# Altium PCB PCB1.PcbDoc
Units mm, origin at the board's own origin, x right, y up, seen from the top; angles counter-clockwise.
Board outline 100 x 100 mm, 2 copper layers (Top Layer, Bottom Layer); 31 components, 67 nets, 286 pads, 40 vias.
Unrouted connection lines stored in the file: 58.
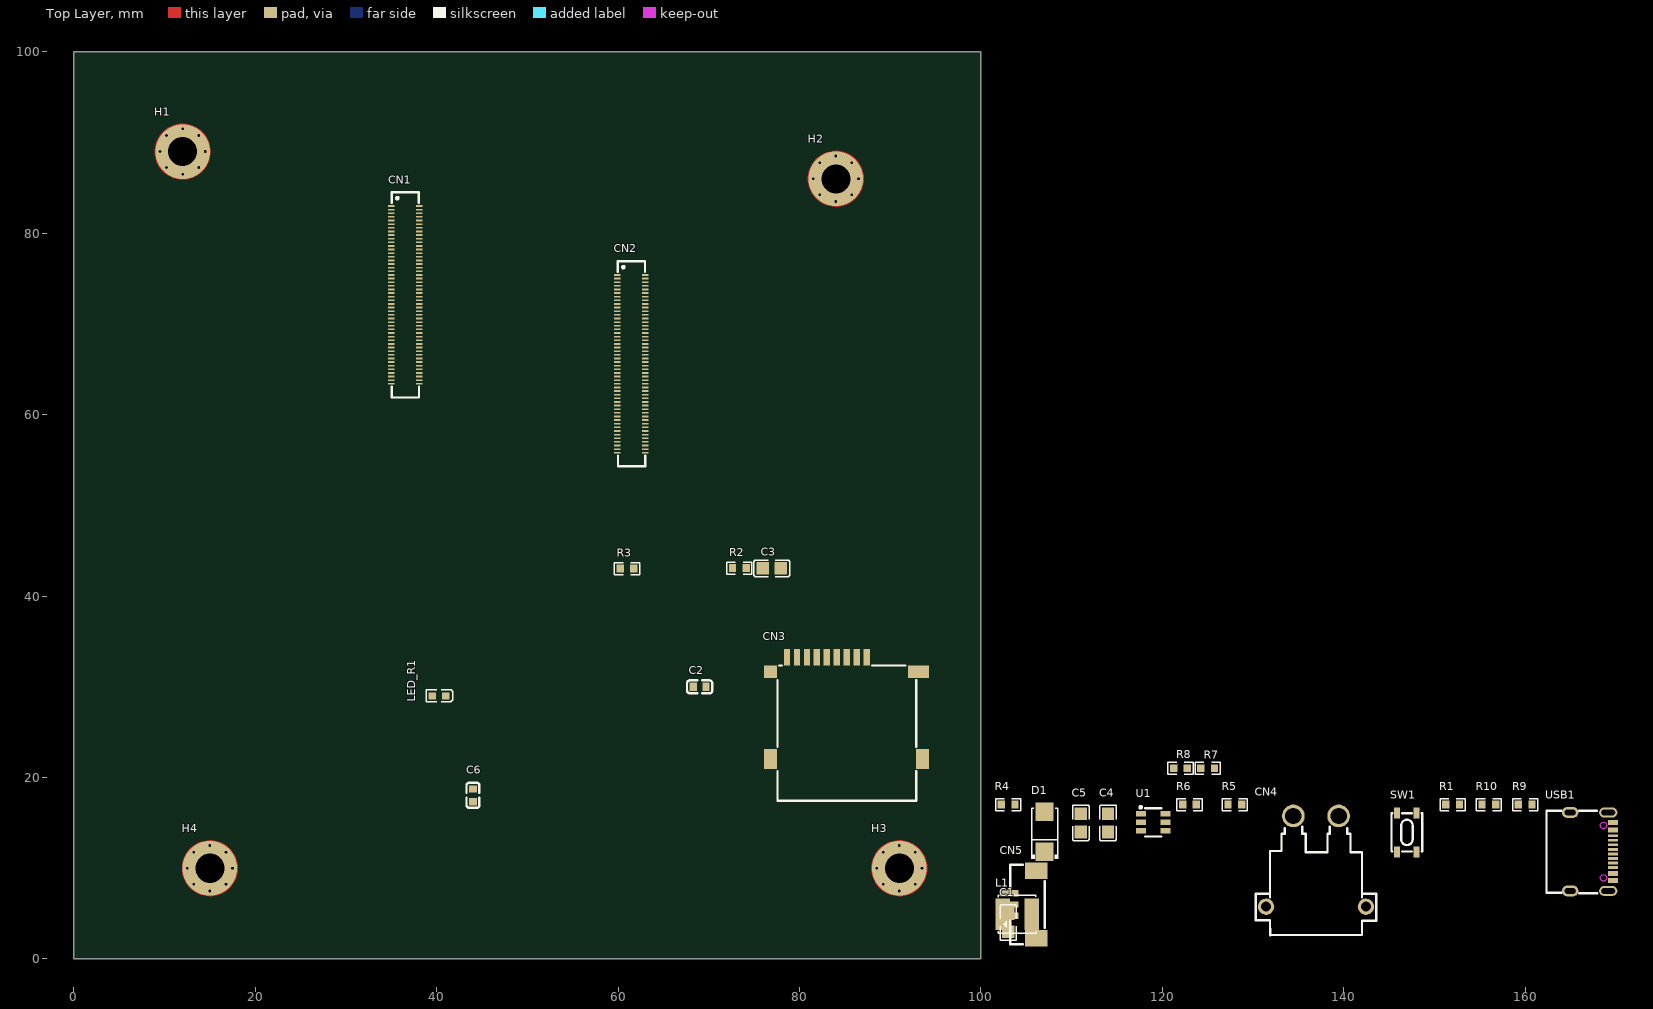
[diagram p0: Top Layer view]
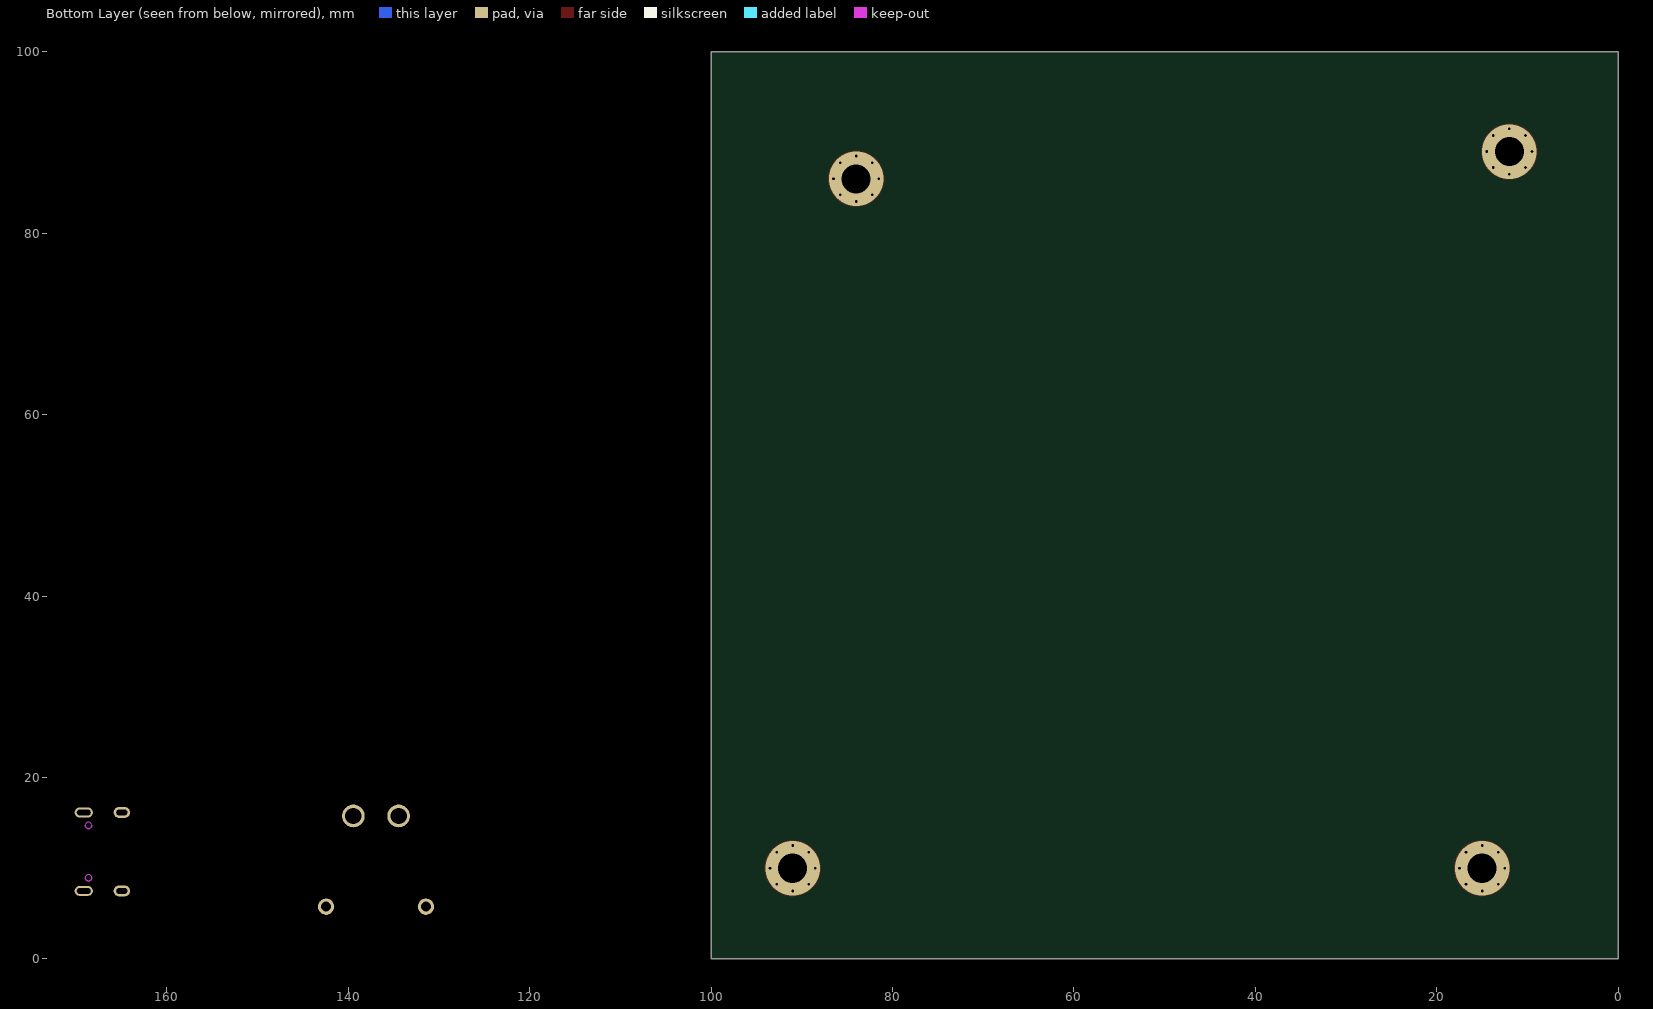
[diagram p1: Bottom Layer view, seen from below]

## Layer stack, top to bottom
Top Solder: solder mask 0.0102, Solder Resist, Dk 3.5
Top Layer: signal copper 0.0356
Dielectric 1: dielectric 0.32, FR-4, Dk 4.8
Bottom Layer: signal copper 0.0356
Bottom Solder: solder mask 0.0102, Solder Resist, Dk 3.5

## Board outline
0,0 0,100 100,100 100,0

## Design rules (kind name [scope] priority, off if disabled: settings)
Clearance [All] p1: gap=0.254 ignorepadtopadclearanceinfootprint=FALSE
PolygonConnect [All] p1: connectstyle=Relief reliefconductorwidth=0.254 reliefentries=4 polygonreliefangle="90 Angle" airgapwidth=0.254
RoutingVias [All] p1: holewidth=0.711 width=1.27 viastyle="Through Hole" minholewidth=0.711 minwidth=1.27 maxholewidth=0.711 maxwidth=1.27
SolderMaskExpansion [All] p1: expansion=0.102 istentingtop=FALSE
SupplyNets "Schematic Supply Nets_4" [InNet('VBUS')] p1: voltage=0.000
SupplyNets "Schematic Supply Nets_3" [InNet('VCC')] p2: voltage=0.000
SupplyNets "Schematic Supply Nets_2" [InNet('3V3')] p3: voltage=0.000
SupplyNets "Schematic Supply Nets_1" [InNet('GND')] p4: voltage=0.000
SupplyNets "Schematic Supply Nets" [InNet('VCC5V0_SYS')] p5: voltage=0.000
Width [All] p1: maxlimit=0.254 minlimit=0.254 preferedwidth=0.254
30 further rules are at their usual default settings.

## Components (designator, comment, footprint, x,y, rotation, side; value= is the part's Value field where it differs from the comment)
C1 "10uF" C0805 103,4 r90 top
C2 "100nF" C0603 69,30 r0 top
C3 "22uF" C0805 76.929,43.067 r0 top
C4 "22uF" C0805 114,15 r90 top
C5 "10uF" C0805 111,15 r90 top
C6 "100nF" C0603 44,18.05 r90 top
CN1 "DF40HC(3.0)-100DS-0.4V(58)" DF40HC_3.0_100DS_0.4V_58 36.555,73.197 r0 top
CN2 "DF40HC(3.0)-100DS-0.4V(58)" DF40HC_3.0_100DS_0.4V_58 61.475,65.597 r0 top
CN3 "MicroSD_Socket_PushPush" "TF卡槽 (自弹式)" 85,25 r0 top
CN4 "XT30PW-M30.G.Y" XT30PW-M30.G.Y 137,8 r0 top
CN5 "ZX-MX1.25-3PLT" MX1.25-3PLT 105,6 r90 top
D1 "SMAJ36A" SMA_DO-214AC 107,14 r90 top
H1 "MountingHole_M3_GND" MountingHole_M3_GND_3.2 12,89 r0 top
H2 "MountingHole_M3_GND" MountingHole_M3_GND_3.2 84,86 r0 top
H3 "MountingHole_M3_GND" MountingHole_M3_GND_3.2 91,10 r0 top
H4 "MountingHole_M3_GND" MountingHole_M3_GND_3.2 15,10 r0 top
L1 "10uH" L4020 104,5 r0 top
LED_R1 "LED_R" LED_0603_R 40.251,29 r180 top
R1 "100Ω" R0603 152,17 r0 top
R2 "100kΩ" R0603 73.373,43.067 r0 top value=100Ω
R3 "13.3kΩ" R0603 61,43 r0 top value=100Ω
R4 "100Ω" R0603 103,17 r0 top
R5 "100Ω" R0603 128,17 r0 top
R6 "100Ω" R0603 123,17 r0 top
R7 "5.1kΩ" R0603 125,21 r0 top value=100Ω
R8 "220Ω" R0603 122,21 r0 top value=100Ω
R9 "220Ω" R0603 160,17 r0 top value=100Ω
R10 "5.1kΩ" R0603 156,17 r0 top value=100Ω
SW1 "HX TS3425PA 250gf 098" SW_SMD_4P_4.2X3.4 147,14 r90 top
U1 "TPS54308DDCR" SOT-23-6 119,15 r0 top
USB1 "USB_Type-C_16P_F" USB_Type-C_SMD_16P_F 166,12 r90 top

## Footprints (in the part's own frame and the unit in brackets; to place one, negate y for a bottom-side part, rotate by r counter-clockwise, add the part's x,y. Pads: shape width x height; smd on the part's side, far side on the other; paste and mask are expansions set on the pad)
C0603 [mil]
  rect 31.5x35.4 smd: 1(-27.8,0) 2(27.3,0)
  silkscreen extent -55,-28 54,28, body extent -32,-15 31,17, height 31
C0805 [mil]
  rect 55.5x53.1 smd paste-3937 mask+2: 1(-39.1,-0.4) 2(39.7,-0.4)
  silkscreen extent -77,-36 78,35, body extent -41,-26 37,25, height 51
DF40HC_3.0_100DS_0.4V_58 [mm] "Hirose DF40HC(3.0)-100DS-0.4V(58) 板对板连接器母座封装，100Pin，0.4mm 间距，3.0mm 配合高度"
  rect 0.7x0.19 smd paste+0 mask+0.051: 1(-1.555,9.803) 2(-1.555,9.403) 3(-1.555,9.003) 4(-1.555,8.603) 5(-1.555,8.203) 6(-1.555,7.803) 7(-1.555,7.403) 8(-1.555,7.003) 9(-1.555,6.603) 10(-1.555,6.203) 11(-1.555,5.803) 12(-1.555,5.403) 13(-1.555,5.003) 14(-1.555,4.603) 15(-1.555,4.203) 16(-1.555,3.803) 17(-1.555,3.403) 18(-1.555,3.003) 19(-1.555,2.603) 20(-1.555,2.203) 21(-1.555,1.803) 22(-1.555,1.403) 23(-1.555,1.003) 24(-1.555,0.603) 25(-1.555,0.203) 26(-1.555,-0.197) 27(-1.555,-0.597) 28(-1.555,-0.997) 29(-1.555,-1.397) 30(-1.555,-1.797) 31(-1.555,-2.197) 32(-1.555,-2.597) 33(-1.555,-2.997) 34(-1.555,-3.397) 35(-1.555,-3.797) 36(-1.555,-4.197) 37(-1.555,-4.597) 38(-1.555,-4.997) 39(-1.555,-5.397) 40(-1.555,-5.797) 41(-1.555,-6.197) 42(-1.555,-6.597) 43(-1.555,-6.997) 44(-1.555,-7.397) 45(-1.555,-7.797) 46(-1.555,-8.197) 47(-1.555,-8.597) 48(-1.555,-8.997) 49(-1.555,-9.397) 50(-1.555,-9.797) 51(1.525,-9.797) 52(1.525,-9.397) 53(1.525,-8.997) 54(1.525,-8.597) 55(1.525,-8.197) 56(1.525,-7.797) 57(1.525,-7.397) 58(1.525,-6.997) 59(1.525,-6.597) 60(1.525,-6.197) 61(1.525,-5.797) 62(1.525,-5.397) 63(1.525,-4.997) 64(1.525,-4.597) 65(1.525,-4.197) 66(1.525,-3.797) 67(1.525,-3.397) 68(1.525,-2.997) 69(1.525,-2.597) 70(1.525,-2.197) 71(1.525,-1.797) 72(1.525,-1.397) 73(1.525,-0.997) 74(1.525,-0.597) 75(1.525,-0.197) 76(1.525,0.203) 77(1.525,0.603) 78(1.525,1.003) 79(1.525,1.403) 80(1.525,1.803) 81(1.525,2.203) 82(1.525,2.603) 83(1.525,3.003) 84(1.525,3.403) 85(1.525,3.803) 86(1.525,4.203) 87(1.525,4.603) 88(1.525,5.003) 89(1.525,5.403) 90(1.525,5.803) 91(1.525,6.203) 92(1.525,6.603) 93(1.525,7.003) 94(1.525,7.403) 95(1.525,7.803) 96(1.525,8.203) 97(1.525,8.603) 98(1.525,9.003) 99(1.525,9.403) 100(1.525,9.803)
  silkscreen extent -1.52,-11.3 1.51,11.3, body extent -1.72,-11.29 1.66,11.31, height 2.83
L4020 [mil] "SMD 贴片功率电感;标称尺寸4.0 × 4.0 mm;额定电流 1.1A;饱和电流 1.5A"
  rect 63x137.8 smd: 1(-63.5,-2.5) 2(62.5,-2.5)
  silkscreen extent -82,-85 82,80, body extent -78,-81 79,76, height 75
LED_0603_R [mil]
  rect 31.5x31.5 smd: 1(-29.5,0) 2(29.5,0)
  silkscreen extent -61,-26 55,26, body extent -31,-16 31,16, height 24
MountingHole_M3_GND_3.2 [mm]
  Top Layer circle w0.2: c0,0 r3
MX1.25-3PLT [mm] "MX1.25-3PLT，3Pin，1.25mm间距，SMD连接器"
  rect 0.7x2 smd paste+0 mask+0.05: 1(-1.243,1.863) 2(0.007,1.863) 3(1.257,1.863)
  rect 1.8x2.5 smd paste+0 mask+0.05: 4(3.737,-1.087) 5(-3.723,-1.087)
  silkscreen extent -4.37,-2.04 4.38,2.55
R0603 [mil]
  rect 31.8x34 smd paste-3937 mask+2: 1(-30.1,1) 2(29.2,1)
  silkscreen extent -55,-25 54,27, body extent -32,-14 31,17, height 18
SMA_DO-214AC [mm] "SMA（DO-214AC）贴片二极管封装，2焊盘，适用于TVS及整流二极管"
  rect 1.999x1.999 smd: 1(-2.174,-0.02) 2(2.225,-0.02)
  silkscreen extent -2.96,-1.52 2.63,1.48, body extent -2.35,-1.33 2.35,1.27, height 2.07
SOT-23-6 [mm] "SOT-23-6贴片封装，本体约2.9×1.6mm，0.95mm引脚间距"
  rect 1.1x0.6 smd paste+0 mask+0.051: 1(-1.347,1.011) 2(-1.347,0.061) 3(-1.347,-0.889) 4(1.353,-0.889) 5(1.353,0.061) 6(1.353,1.011)
  silkscreen extent -1.52,-1.49 0.9,1.84, body extent -1.25,-1.42 1.25,1.58, height 1.1
SW_SMD_4P_4.2X3.4 [mm] "4脚贴片轻触按键，卧式顶部按压，尺寸4.2×3.4mm，高度2.5mm"
  rect 1.199x0.65 smd: 1(-2.195,1.125) 2(2.106,1.125) 3(-2.195,-1.026) 4(2.106,-1.026)
  silkscreen extent -2.14,-1.65 2.05,1.75, body extent -2.65,-1.67 2.55,1.73, height 2.47
"TF卡槽 (自弹式)" [mil] "MicroSD（TF）卡槽，贴片，Push-Push 自弹式"
  rect 27.6x70.9 smd: 1(95.1,325) 2(51.8,325) 3(8.5,325) 4(-34.8,325) 5(-78.1,325) 6(-121.4,325) 7(-164.7,325) 8(-208,325) CD(-251.3,325)
  rect 90.6x55.1 smd: 10(319.5,262.1)
  rect 57.1x55.1 smd: 11(-323,262.1)
  rect 57.1x86.6 smd: 12(336.5,-115.9) 13(-323,-115.9)
  silkscreen extent -292,-297 310,290, body extent -314,-360 320,311, height 73
USB_Type-C_SMD_16P_F [mil] "USB_Type-C贴片母座16P"
  rect 21.7x43.3 smd paste-3937 mask+2: 1(119.2,-145.4) 2(87.7,-145.4) 11(-101.3,-145.4) 12(-132.8,-145.4)
  rect 11.8x43.3 smd paste-3937 mask+2: 3(62.1,-145.4) 4(42.4,-145.4) 5(22.7,-145.4) 6(3,-145.4) 7(-16.6,-145.4) 8(-36.3,-145.4) 9(-56,-145.4) 10(-75.7,-145.4)
  oval 43.3x78.7 hole 23.6 slot 59.1 at 90 deg paste-99999 mask+2: 13(163.5,-123.7) 14(-177.1,-123.7)
  oval 47.2x70.9 hole 23.6 slot 47.2 at 90 deg paste-99999 mask+2: 13(163.5,41.6) 14(-177.1,41.6)
  Keep-Out Layer board cut-out: -134.4,-103.3 -134,-100.1 -132.9,-97.1 -131.1,-94.4 -128.8,-92.2 -126,-90.6 -123,-89.7 -119.8,-89.5 -116.6,-90.1 -113.7,-91.3 -111.1,-93.2 -109.1,-95.7 -107.6,-98.5 -106.9,-101.7 -106.9,-104.9 -107.6,-108 -109.1,-110.8 -111.1,-113.3 -113.7,-115.2 -116.6,-116.5 -119.8,-117 -123,-116.8 -126,-115.9 -128.8,-114.3 -131.1,-112.1 -132.9,-109.4 -134,-106.4 -134.4,-103.3
  Keep-Out Layer board cut-out: 93.2,-103.3 93.6,-100.1 94.7,-97.1 96.4,-94.4 98.7,-92.2 101.5,-90.6 104.6,-89.7 107.8,-89.5 110.9,-90.1 113.9,-91.3 116.4,-93.2 118.5,-95.7 119.9,-98.5 120.7,-101.7 120.7,-104.9 119.9,-108 118.5,-110.8 116.4,-113.3 113.9,-115.2 110.9,-116.5 107.8,-117 104.6,-116.8 101.5,-115.9 98.7,-114.3 96.4,-112.1 94.7,-109.4 93.6,-106.4 93.2,-103.3
  Keep-Out Layer region: -134.4,-103.3 -134,-100.1 -132.9,-97.1 -131.1,-94.4 -128.8,-92.2 -126,-90.6 -123,-89.7 -119.8,-89.5 -116.6,-90.1 -113.7,-91.3 -111.1,-93.2 -109.1,-95.7 -107.6,-98.5 -106.9,-101.7 -106.9,-104.9 -107.6,-108 -109.1,-110.8 -111.1,-113.3 -113.7,-115.2 -116.6,-116.5 -119.8,-117 -123,-116.8 -126,-115.9 -128.8,-114.3 -131.1,-112.1 -132.9,-109.4 -134,-106.4 -134.4,-103.3
  Keep-Out Layer region: -134.4,-103.3 -134,-100.1 -132.9,-97.1 -131.1,-94.4 -128.8,-92.2 -126,-90.6 -123,-89.7 -119.8,-89.5 -116.6,-90.1 -113.7,-91.3 -111.1,-93.2 -109.1,-95.7 -107.6,-98.5 -106.9,-101.7 -106.9,-104.9 -107.6,-108 -109.1,-110.8 -111.1,-113.3 -113.7,-115.2 -116.6,-116.5 -119.8,-117 -123,-116.8 -126,-115.9 -128.8,-114.3 -131.1,-112.1 -132.9,-109.4 -134,-106.4 -134.4,-103.3
  Keep-Out Layer region: 93.2,-103.3 93.6,-100.1 94.7,-97.1 96.4,-94.4 98.7,-92.2 101.5,-90.6 104.6,-89.7 107.8,-89.5 110.9,-90.1 113.9,-91.3 116.4,-93.2 118.5,-95.7 119.9,-98.5 120.7,-101.7 120.7,-104.9 119.9,-108 118.5,-110.8 116.4,-113.3 113.9,-115.2 110.9,-116.5 107.8,-117 104.6,-116.8 101.5,-115.9 98.7,-114.3 96.4,-112.1 94.7,-109.4 93.6,-106.4 93.2,-103.3
  Keep-Out Layer region: 93.2,-103.3 93.6,-100.1 94.7,-97.1 96.4,-94.4 98.7,-92.2 101.5,-90.6 104.6,-89.7 107.8,-89.5 110.9,-90.1 113.9,-91.3 116.4,-93.2 118.5,-95.7 119.9,-98.5 120.7,-101.7 120.7,-104.9 119.9,-108 118.5,-110.8 116.4,-113.3 113.9,-115.2 110.9,-116.5 107.8,-117 104.6,-116.8 101.5,-115.9 98.7,-114.3 96.4,-112.1 94.7,-109.4 93.6,-106.4 93.2,-103.3
  Keep-Out Layer lines w0.1: -119.8,-89.5 -116.6,-90.1 -113.7,-91.3 -111.1,-93.2 -109.1,-95.7 -107.6,-98.5 -106.9,-101.7 -106.9,-104.9 -107.6,-108 -109.1,-110.8 -111.1,-113.3 -113.7,-115.2 -116.6,-116.5 -119.8,-117 -123,-116.8 -126,-115.9 -128.8,-114.3 -131.1,-112.1 -132.9,-109.4 -134,-106.4 -134.4,-103.3 -134,-100.1 -132.9,-97.1 -131.1,-94.4 -128.8,-92.2 -126,-90.6 -123,-89.7 -119.8,-89.5 ; 107.8,-89.5 110.9,-90.1 113.9,-91.3 116.4,-93.2 118.5,-95.7 119.9,-98.5 120.7,-101.7 120.7,-104.9 119.9,-108 118.5,-110.8 116.4,-113.3 113.9,-115.2 110.9,-116.5 107.8,-117 104.6,-116.8 101.5,-115.9 98.7,-114.3 96.4,-112.1 94.7,-109.4 93.6,-106.4 93.2,-103.3 93.6,-100.1 94.7,-97.1 96.4,-94.4 98.7,-92.2 101.5,-90.6 104.6,-89.7 107.8,-89.5
  silkscreen extent -187,-75 170,144, body extent -196,-161 182,142, height 125
XT30PW-M30.G.Y [mil] "AMASS XT30系列，2Pin，卧式PCB通孔安装，公头"
  round 98.4 hole 70.9: 1(-101.3,305.7) 2(95.6,305.7)
  round 70.9 hole 43.3: 3(213.7,-88) 4(-219.4,-88)
  silkscreen extent -265,-212 259,259, body extent -266,-205 258,344, height 197

## Part data
C1 C2 C3 C4 C5 C6: library part C, "贴片电容(MLCC)", Voltage=50V
CN1 CN2: library part DF40HC_3.0_100DS_0.4V, "Hirose DF40系列，100Pin，0.4mm间距，3.0mm配合高度，板对板连接器母座"
CN3: "卡连接方式:自弹式;卡类型:MicroSD卡(TF卡);连接器类型:卡座;本体最大高度:1.8mm;工作温度:-40℃~+85℃;"
CN4: "XT30系列，2Pin，PCB卧式插头，额定电流15A", contact resistance=1.2mΩ, JLCPCB Part Class="Extended Part", LCSC Part Name="AMASS(艾迈斯)航模插头电调机插座锂电池连接器 PCB板卧式 公头XT30PW-M30.G.Y", Manufacturer=AMASS(艾迈斯), Rated current=15A, Rated voltage=500VDC, AddInBom=yes, Connector type=航模插头, ConvertToPcb=yes, Datasheet=https://item.szlcsc.com/datasheet/XT30PW-M30.G.Y/426930.html, Device=XT30PW-M30.G.Y, FootprintName=CONN-TH_XT30PW-M, interface form=公头, ManufacturerPart=XT30PW-M30.G.Y, ModelId=722652c2597f41cd937322584dc4b29b聨0819f05c4eef4c71ace90d822a990e87, ModelName=CONN-TH_XT30PW-M, ModelTransform=523.621,549.2115,0,0,0,0,-0.005,-39.568,-78.74, Size/Specification=2pin, Supplier=LCSC, Supplier Footprint=-, SupplierPart=C431092, Symbol=XT30PW-M, Wire gauge=16/18/20AWG
CN5: "插针结构:1x3P;间距:1.25mm;安装方式:立贴;参考系列:PicoBlade(MX 1.25);总PIN数:3P;排数:1;每排PIN数:3;行距:-;额定电流:1A;触头材质:黄铜;触头镀层:锡;工作温度:-25℃~+85℃;"
D1: "36V 单向瞬态抑制二极管（TVS），SMA（DO-214AC）"
H1 H2 H3 H4: library part MountingHole_M3, "M3 金属化通孔安装孔，连接 GND，用于 PCB 螺丝固定及接地"
L1: library part L
R1 R2 R3: library part "FRC0603J101 TS", "电阻类型:厚膜电阻;阻值:100Ω;精度:±5%;功率:100mW;工作电压:75V;温度系数:±100ppm/℃;", JLCPCB Part Class="Extended Part", LCSC Part Name="100Ω ±5% 100mW 厚膜电阻", Manufacturer=FOJAN(富捷), Operating Temperature=-55℃~+155℃, Power(Watts)=100mW, Temperature Coefficient=±100ppm/℃, Tolerance=±5%, Voltage-Supply(Max)=75V, AddInBom=yes, ConvertToPcb=yes, Datasheet=https://item.szlcsc.com/datasheet/FRC0603J101%2520TS/3180602.html, Device="FRC0603J101 TS", FootprintName=R0603, ManufacturerPart="FRC0603J101 TS", ModelId=fc143cca1e79419f9cd78b61e9279f08聨0819f05c4eef4c71ace90d822a990e87, ModelName=R0603, ModelTransform=31.8897,63.7794,0,90,0,0,0,0,0, Supplier=LCSC, Supplier Footprint=0603, SupplierPart=C2907089, Symbol="FRC0603J101 TS", Type=厚膜电阻
R4: library part R, "贴片电阻"
R5 R6 R7 R8 R9 R10: library part FRC0603F1000TS, "电阻类型:厚膜电阻;阻值:100Ω;精度:±1%;功率:100mW;工作电压:75V;温度系数:±100ppm/℃;", JLCPCB Part Class="Extended Part", LCSC Part Name="100Ω ±1% 100mW 厚膜电阻", Manufacturer=FOJAN(富捷), Operating Temperature=-55℃~+155℃, Power(Watts)=100mW, Temperature Coefficient=±100ppm/℃, Tolerance=±1%, Voltage-Supply(Max)=75V, 3D Model=fc143cca1e79419f9cd78b61e9279f08聨0819f05c4eef4c71ace90d822a990e87, 3D Model Transform=31.8897,63.7794,0,90,0,0,0,0,0, AddInBom=yes, ConvertToPcb=yes, Datasheet=https://item.szlcsc.com/datasheet/FRC0603F1000TS/3180494.html, Device=FRC0603F1000TS, FootprintName=R0603, Manufacturer Part=FRC0603F1000TS, ModelName=R0603, Supplier=LCSC, Supplier Footprint=0603, Supplier Part=C2906981, Symbol=FRC0603F1000TS, Type=厚膜电阻
SW1: library part "HX TS3425PA", "4Pin贴片轻触开关，4.2×3.4mm，操作高度2.5mm，操作力250gf", Actuator/Cap Color=白色, Contact Current=50mA, JLCPCB Part Class="Extended Part", LCSC Part Name="电子烟轻触开关 平脚3.4*4.2*2.5mm 250gf", Manufacturer=hanxia(韩下), Operating Force=1.6N, Operating Temperature=-20℃~+80℃, Voltage Rating=12V, 3D Model=8f5161de2aba47ef91b81c2f817ddd4f聨0819f05c4eef4c71ace90d822a990e87, 3D Model Transform=204.724,133.858,0,0,0,0,0.002,0.002,0, Actuator Style=椭圆形按钮, AddInBom=yes, Circuit=单刀单掷, ConvertToPcb=yes, Datasheet=https://item.szlcsc.com/datasheet/HX%2520TS3425PA%2520250gf%2520098/8703857.html, Device="HX TS3425PA 250gf 098", FootprintName=SW-SMD_4P-L4.2-W3.4-P2.15-LS5.2, Length=4.2mm, Life=10万次, Manufacturer Part="HX TS3425PA 250gf 098", ModelName=SW-SMD_4P-L4.2-W3.4-H2.5-P2.15-LS5.2, Mounting Type=立贴, Supplier=LCSC, Supplier Footprint=SMD,4.2x3.4mm, Supplier Part=C7587757, Switch Height=2.5mm, Symbol="HX TS3425PA 250GF 098", Termination Style=SMD接片, Width=3.4mm, with Bracket=不带支架
U1: "3A 同步降压转换器，4.5V~28V 输入，可调输出，SOT-23-6"
USB1: "USB_Type-C母座", BOM名称=USB_Type-C母座

## Via types
v1: diameter 1, hole 0.3, Top Layer to Bottom Layer, 36 vias
v2: diameter 6, hole 3.2, Top Layer to Bottom Layer, 4 vias

## Nets (pads, with @x,y where several pads share a name; then routed paths per layer and width w, separated by ;. In a path a pad name is that pad's centre, name@x,y a point inside that pad or via, vN(x,y) a via of type N, cw(c..) or ccw(c..) an arc to the next point about the centre after c; other vN are vias at no path point)
3V3: C1.2 CN3.4
AUDIO_ADC0_MICN: CN2.66
AUDIO_ADC0_MICP: CN2.67
AUDIO_ADC1_MICN: CN2.64
AUDIO_ADC1_MICP: CN2.65
DN: R8.2
DP: R9.2
FSPI_CLK: CN2.93
FSPI_CSN: CN2.94
FSPI_D0: CN2.96
FSPI_D1: CN2.98
FSPI_D2: CN2.95
FSPI_D3: CN2.97
GND: C1.1 C3.1 C4.1 C5.1 C6.1 CN2.52 CN2.63 CN2.68 CN3.6 CN3.10 CN3.11 CN3.12 CN3.13 CN5.1 CN5.4 CN5.5 D1.2 LED_R1.2 R3.1 R7.2 R10.2 U1.1 USB1.1 USB1.12 USB1.13 USB1.14
GPIO0_A0_Z: CN2.81
GPIO0_A2_Z: CN2.79
GPIO0_A3_U: CN2.78
GPIO0_A5_U: CN2.75
GPIO0_A7_U: CN2.89
GPIO0_B0_D: CN2.90
GPIO0_B2_D: CN2.92
GPIO0_C5_D: CN2.83
GPIO0_C6_D: CN2.82
GPIO0_C7_D: CN2.84
GPIO0_D0_D: CN2.85
GPIO0_D1_D: CN2.86
GPIO_A4_D: CN2.87
GPIO_A5_U: R1.1
GPIO_A6_U: CN2.88
GPIO_B1_D: CN2.91
I2S0_LPCK/DSM_AUD_LN: CN2.55
I2S0_MCLK: CN2.71
I2S0_SCLK_TX: CN2.54
I2S0_SDI1/DSM_AUD_RP: CN2.72
I2S0_SDI2/DSM_AUD_RN: CN2.73
I2S0_SDI3: CN2.74
I2S0_SDIO: CN2.70
I2S0_SDO0/DSM_AUD_LP: CN2.56
NetC2_1: C2.1 U1.6
NetC2_2: C2.2 L1.1 U1.2
NetCN3_CD: CN3.CD R1.2
NetCN5_2: CN5.2 R5.2
NetCN5_3: CN5.3 R6.2
NetLED_R1_1: LED_R1.1 R4.2
NetR2_1: R2.1 R3.2 U1.4
NetR7_1: R7.1 USB1.4
NetR8_1: R8.1 USB1.6 USB1.8
NetR9_1: R9.1 USB1.5 USB1.7
NetR10_1: R10.1 USB1.10
PDM_CLK0: CN2.69
PDM_CLK1: CN2.53
RESET: CN2.80
SDMMC0_CLK: CN2.59 CN3.5
SDMMC0_CMD: CN2.61 CN3.3
SDMMC0_D0: CN2.58 CN3.7
SDMMC0_D1: CN2.57 CN3.8
SDMMC0_D2: CN2.60 CN3.1
SDMMC0_D3: CN2.62 CN3.2
UART0_RX_DBG: CN2.77
UART0_RX_DEG: R6.1
UART0_TX_DBG: CN2.76
UART0_TX_DEG: R5.1
USB2_HOST_DM: CN2.99
USB2_HOST_DP: CN2.100
VBUS: USB1.2 USB1.11
VCC: C5.2 C6.2 D1.1 U1.3
VCC5V0_SYS: C3.2 C4.2 CN2.51 L1.2 R2.2 R4.1
pads on no net: CN1.1 CN1.2 CN1.3 CN1.4 CN1.5 CN1.6 CN1.7 CN1.8 CN1.9 CN1.10 CN1.11 CN1.12 CN1.13 CN1.14 CN1.15 CN1.16 CN1.17 CN1.18 CN1.19 CN1.20 CN1.21 CN1.22 CN1.23 CN1.24 CN1.25 CN1.26 CN1.27 CN1.28 CN1.29 CN1.30 CN1.31 CN1.32 CN1.33 CN1.34 CN1.35 CN1.36 CN1.37 CN1.38 CN1.39 CN1.40 CN1.41 CN1.42 CN1.43 CN1.44 CN1.45 CN1.46 CN1.47 CN1.48 CN1.49 CN1.50 CN1.51 CN1.52 CN1.53 CN1.54 CN1.55 CN1.56 CN1.57 CN1.58 CN1.59 CN1.60 CN1.61 CN1.62 CN1.63 CN1.64 CN1.65 CN1.66 CN1.67 CN1.68 CN1.69 CN1.70 CN1.71 CN1.72 CN1.73 CN1.74 CN1.75 CN1.76 CN1.77 CN1.78 CN1.79 CN1.80 CN1.81 CN1.82 CN1.83 CN1.84 CN1.85 CN1.86 CN1.87 CN1.88 CN1.89 CN1.90 CN1.91 CN1.92 CN1.93 CN1.94 CN1.95 CN1.96 CN1.97 CN1.98 CN1.99 CN1.100 CN2.1 CN2.2 CN2.3 CN2.4 CN2.5 CN2.6 CN2.7 CN2.8 CN2.9 CN2.10 CN2.11 CN2.12 CN2.13 CN2.14 CN2.15 CN2.16 CN2.17 CN2.18 CN2.19 CN2.20 CN2.21 CN2.22 CN2.23 CN2.24 CN2.25 CN2.26 CN2.27 CN2.28 CN2.29 CN2.30 CN2.31 CN2.32 CN2.33 CN2.34 CN2.35 CN2.36 CN2.37 CN2.38 CN2.39 CN2.40 CN2.41 CN2.42 CN2.43 CN2.44 CN2.45 CN2.46 CN2.47 CN2.48 CN2.49 CN2.50 CN4.1 CN4.2 CN4.3 CN4.4 SW1.1 SW1.2 SW1.3 SW1.4 U1.5 USB1.3 USB1.9
copper on no net:
  other v1: 15,7.5 91,7.5 13.232,8.232 16.768,8.232 89.232,8.232 92.768,8.232 12.5,10 17.5,10 17.5,10 88.5,10 93.5,10 93.5,10 13.232,11.768 16.768,11.768 89.232,11.768 92.768,11.768 15,12.5 91,12.5 84,83.5 82.232,84.232 85.768,84.232 81.5,86 86.5,86 86.5,86 12,86.5 10.232,87.232 13.768,87.232 82.232,87.768 85.768,87.768 84,88.5 9.5,89 14.5,89 14.5,89 10.232,90.768 13.768,90.768 12,91.5
  other v2: 15,10 91,10 84,86 12,89

## Silkscreen, mask and mechanical layers (free items; w line width, h text height)
Mechanical 1:
  the board outline again, w0.254